# Altium PCB LLR-05U (Secondary-Board-PCB).PcbDoc
Units mil, origin at the board's own origin, x right, y up, seen from the top; angles counter-clockwise.
Board outline 2442.77 x 1283.01 mil, 2 copper layers (Top Layer, Bottom Layer), stack 57 mil thick; 48 components, 33 nets, 142 pads, 63 vias.
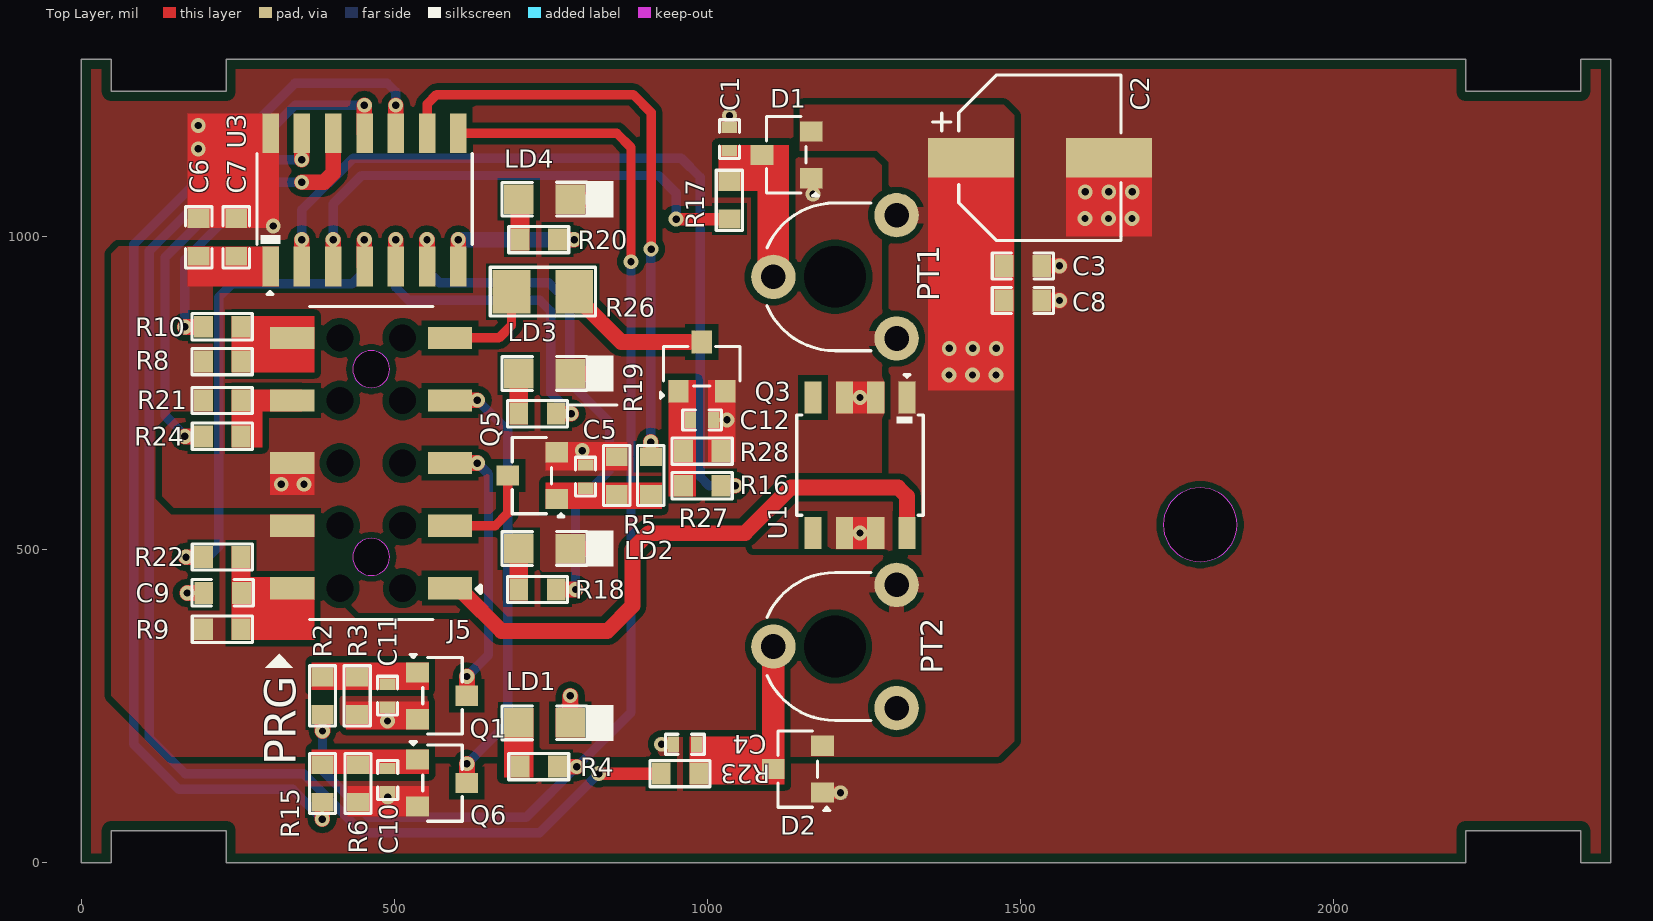
[diagram p0: Top Layer view]
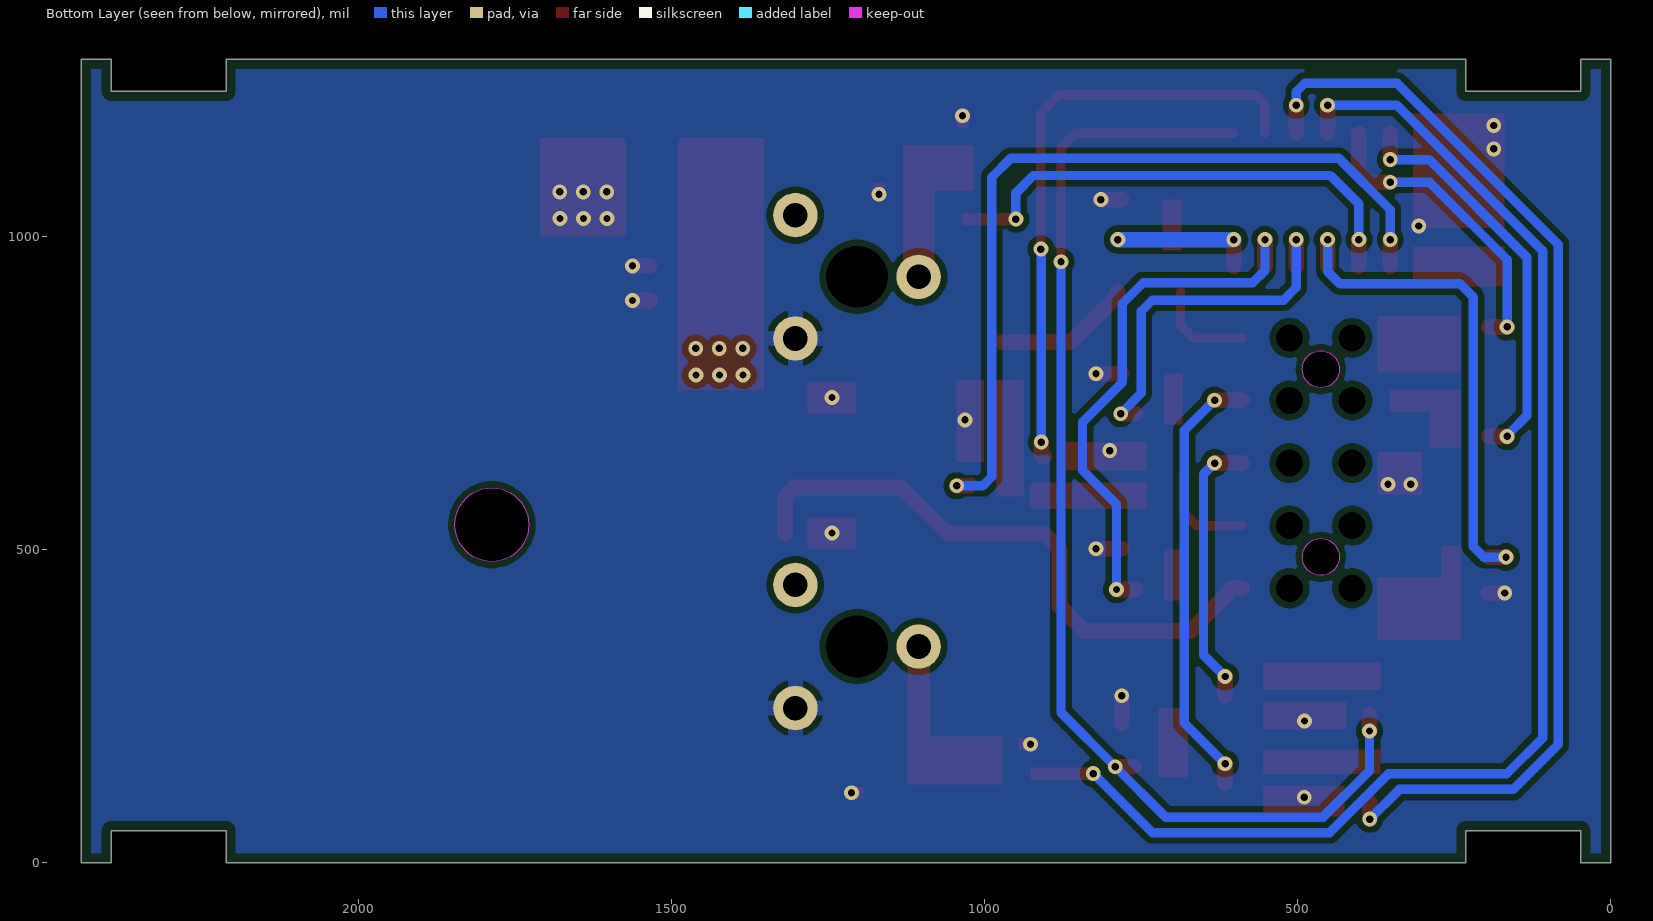
[diagram p1: Bottom Layer view, seen from below]
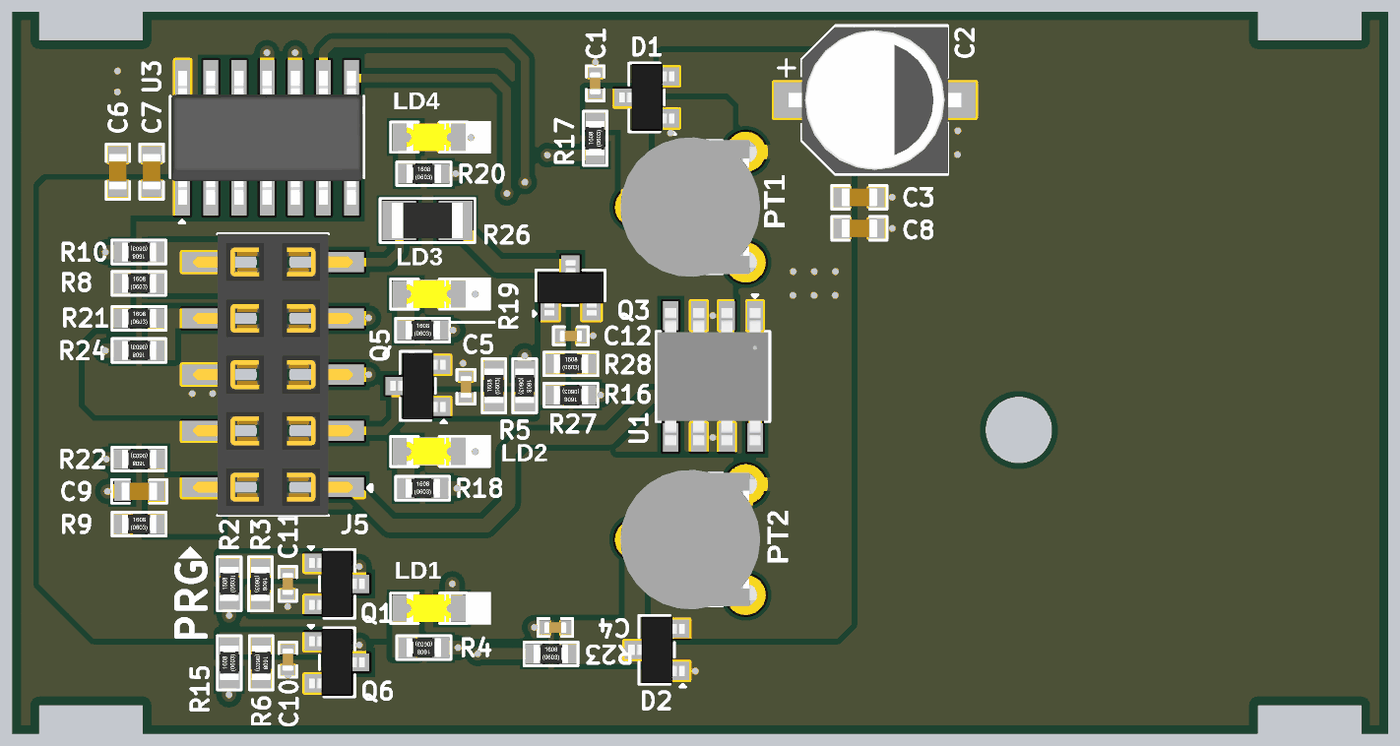
[diagram p2: 3D render of the assembled board from above, using the file's embedded part models]

## Layer stack, top to bottom
Top Solder: solder mask 3, Solder Resist, Dk 3.5
Top Layer: signal copper 10
Dielectric 1: dielectric 37, FR-4, Dk 4.8
Bottom Layer: signal copper 10
Bottom Solder: solder mask 3, Solder Resist, Dk 3.5

## Board outline
47.29,0 47.29,51.18 231.54,51.18 231.54,0 2211.24,0 2211.24,51.18 2395.49,51.18 2395.49,0 2442.77,0 2442.77,1283.02 2395.49,1283.02 2395.49,1231.83 2211.24,1231.83 2211.24,1283.02 231.54,1283.02 231.54,1231.83 47.29,1231.83 47.29,1283.02 0,1283.02 0,0
cut-out: 1728.11,539.81 ccw(c1787.16,539.81) 1787.16,480.75 ccw(c1787.16,539.81) 1846.22,539.81 ccw(c1787.16,539.81) 1787.16,598.86 ccw(c1787.16,539.81)
cut-out: 433.42,488.23 ccw(c462.95,488.23) 462.95,458.7 ccw(c462.95,488.23) 492.47,488.23 ccw(c462.95,488.23) 462.95,517.76 ccw(c462.95,488.23)
cut-out: 433.42,788.23 ccw(c462.95,788.23) 462.95,758.7 ccw(c462.95,788.23) 492.47,788.23 ccw(c462.95,788.23) 462.95,817.76 ccw(c462.95,788.23)

## Design rules (kind name [scope] priority, off if disabled: settings)
BoardOutlineClearance [All] p1: gap=0 ignorepadtopadclearanceinfootprint=FALSE except(15: Poly-OutlineEdge)
Clearance [All] p1: gap=10 ignorepadtopadclearanceinfootprint=FALSE except(0: Arc-Hole Track-Hole SMDPad-Hole THPad-Hole Via-Hole Fill-Hole Poly-Hole Region-Hole Text-Hole; 7: SMDPad-SMDPad SMDPad-Fill SMDPad-Region)
MinimumSolderMaskSliver [All] p1: minsoldermaskwidth=0
PolygonConnect [All] p1: thpad.connectstyle=Relief thpad.reliefconductorwidth=25 thpad.reliefentries=4 thpad.polygonreliefangle="90 Angle" thpad.airgapwidth=10 smdpad.connectstyle=Direct smdpad.reliefconductorwidth=10 smdpad.reliefentries=4 smdpad.polygonreliefangle="90 Angle" smdpad.airgapwidth=10 via.connectstyle=Direct via.reliefconductorwidth=10 via.reliefentries=4 via.polygonreliefangle="90 Angle" via.airgapwidth=10
RoutingVias [All] p1: holewidth=11.81 width=23.62 viastyle="Through Hole" minholewidth=11.81 minwidth=23.62 maxholewidth=11.81 maxwidth=23.62
SilkToSilkClearance [All] p1: silktosilkclearance=5
SilkToSolderMaskClearance [IsPad] p1: minsilkscreentomaskgap=0 clearancetoexposedcopper=TRUE
SolderMaskExpansion [All] p1: expansion=4 istentingtop=FALSE
Width [All] p1: maxlimit=50 minlimit=7 preferedwidth=10 minimp=50.000000 maximp=50.000000 favimp=50.000000
27 further rules are at their usual default settings.

## Components (designator, comment, footprint, x,y, rotation, side; value= is the part's Value field where it differs from the comment)
C1 "10nF" Cap-0402 1035.02,1155.64 r270 top
C2 "100uF" RVT1A101M0605 1531.42,1126 r0 top
C3 "4.7uF" Cap-0603 1504,953 r180 top
C4 "10nF" Cap-0402 964,189 r0 top
C5 "10nF" Cap-0402 805.37,616.55 r270 top
C6 "4.7uF" Cap-0603 187.27,998.8 r270 top
C7 "0.1uF" Cap-0603 247.27,998.8 r270 top value=100nF
C8 "0.1uF" Cap-0603 1504,898 r180 top value=100nF
C9 "0.1uF" Cap-0603 225.5,430.94 r0 top value=100nF
C10 "10nF" Cap-0402 489.24,131.81 r90 top
C11 "10nF" Cap-0402 489.02,266.58 r90 top
C12 "10nF" Cap-0402 991.63,706.94 r180 top
D1 "BAT54S" SOT-23 1126.63,1130.6 r90 top
D2 "BAT54S" SOT-23 1144.57,149.29 r90 top
J5 "610010243021" 610010243021 462.73,638.23 r180 top locked
LD1 "Green-Yellow" LED-0805 739.63,223.06 r0 top locked
LD2 "RED" LED-0805 739.63,501.65 r0 top locked
LD3 "RED" LED-0805 739.63,781.25 r0 top locked
LD4 "RED" LED-0805 739.63,1059.84 r0 top locked
PT1 "PT06-M-V-503(50K)" PT06-M-V-503(50K) 1203.84,935.72 r90 top locked
PT2 "PT06-M-V-503(50K)" PT06-M-V-503(50K) 1203.84,345.17 r90 top locked
Q1 "BC846B(1B)" SOT-23 576.31,266.49 r270 top
Q3 "MMBTA42" SOT-23 991,792.27 r0 top
Q5 "BC846B(1B)" SOT-23 720.13,618.23 r90 top
Q6 "BC846B(1B)" SOT-23 576.31,127.08 r270 top
R2 "1K" Res-0603 385.04,266.48 r270 top
R3 "47K" Res-0603 440.4,266.48 r90 top
R4 "1K" Res-0603 730.53,153.3 r0 top
R5 "47K" Res-0603 855.13,618.23 r270 top
R6 "47K" Res-0603 441.77,126.3 r90 top
R8 "10K" Res-0603 224.8,800.3 r180 top
R9 "10K" Res-0603 225.01,372.68 r180 top
R10 "330R" Res-0603 224.8,855.95 r0 top
R15 "1K" Res-0603 385.04,126.3 r270 top
R16 "1K" Res-0603 991.68,601.96 r0 top
R17 "1K" Res-0603 1035.03,1058.04 r270 top
R18 "3.3k" Res-0603 728.55,436.3 r180 top
R19 "3.3k" Res-0603 728.55,717.15 r180 top
R20 "3.3k" Res-0603 730.53,995.17 r180 top
R21 "10K" Res-0603 224.8,738.14 r180 top
R22 "330R" Res-0603 225.01,488.23 r0 top
R23 "1K" Res-0603 956.35,142.21 r180 top
R24 "330R" Res-0603 225,681 r0 top
R26 "2.2K" Res-1206 737,912 r180 top
R27 "1K" Res-0603 909.56,618.23 r90 top
R28 "47K" Res-0603 991.68,657.33 r180 top
U1 "78L05G-SO8-R" SOP-8 1243.8,634.73 r270 top
U3 "PIC16F1823-I/SL" SOIC-14 452.27,1058.8 r90 top

## Footprints (in the part's own frame and the unit in brackets; to place one, negate y for a bottom-side part, rotate by r counter-clockwise, add the part's x,y. Pads: shape width x height; smd on the part's side, far side on the other; paste and mask are expansions set on the pad)
610010243021 [mm]
  rect 1.8x0.9 smd: 1(-3.2,5.08) 2(3.2,5.08) 3(-3.2,2.54) 4(3.2,2.54) 5(-3.2,0) 6(3.2,0) 7(-3.2,-2.54) 8(3.2,-2.54) 9(-3.2,-5.08) 10(3.2,-5.08)
  round 0 hole 1.1 unplated: ""(-1.27,5.08) ""(-1.27,2.54) ""(-1.27,0) ""(-1.27,-2.54) ""(-1.27,-5.08) ""(1.27,5.08) ""(1.27,2.54) ""(1.27,0) ""(1.27,-2.54) ""(1.27,-5.08)
  silkscreen extent -4.43,-6.35 2.5,6.35, body extent -3.6,-6.35 3.6,6.35, height 3.75
Cap-0402 [mil]
  rect 18x25 smd mask+2.36: 1(-18.5,0) 2(18.5,0)
  silkscreen extent -31,-16 31,16, body extent -20,-10 20,10, height 19
Cap-0603 [mil]
  rect 30x35 smd mask+2.36: 1(-30,0) 2(30,0)
  silkscreen extent -49,-21 49,21, body extent -32,-16 31,16, height 34
LED-0805 [mm]
  rect 1.2x1.2 smd: 1(-1.05,0) 2(1.05,0)
  silkscreen extent -1.73,-0.74 2.79,0.74, body extent -1,-0.62 1,0.63, height 1.1
PT06-M-V-503(50K) [mm]
  round 1.8 hole 1: 1(-2.5,-2.5) 2(0,2.5) 3(2.5,-2.5)
  round 0 hole 2.5 unplated: MH(0,0)
  silkscreen extent -3,-1.45 3,2.76, body extent -3.15,-3.16 3.15,3.2, height 4.15
Res-0603 [mil]
  rect 30x35 smd: 1(-30,0) 2(30,0)
  silkscreen extent -48,-21 48,21, body extent -31,-17 31,17, height 18
Res-1206 [mil]
  rect 60x70 smd: 1(-50,0) 2(50,0)
  silkscreen extent -84,-39 84,39, body extent -63,-31 63,31, height 24
RVT1A101M0605 [mm]
  rect 3.5x1.6 smd: 1(-2.8,0) 2(2.8,0)
  silkscreen extent -4.36,-3.35 3.28,3.35, body extent -3.9,-3.3 3.9,3.3, height 7.75
SOIC-14 [mm]
  rect 1.62x0.67 smd: 1(-2.7,3.81) 2(-2.7,2.54) 3(-2.7,1.27) 4(-2.7,0) 5(-2.7,-1.27) 6(-2.7,-2.54) 7(-2.7,-3.81) 8(2.7,-3.81) 9(2.7,-2.54) 10(2.7,-1.27) 11(2.7,0) 12(2.7,1.27) 13(2.7,2.54) 14(2.7,3.81)
  silkscreen extent -3.84,-4.37 1.88,4.37, body extent -3.01,-4.33 3.01,4.33, height 1.75
SOP-8 [mm]
  rect 1.3x0.7 smd: 1(-2.75,1.905) 2(-2.75,0.635) 3(-2.75,-0.635) 4(-2.75,-1.905) 5(2.75,-1.905) 6(2.75,-0.635) 7(2.75,0.635) 8(2.75,1.905)
  silkscreen extent -3.69,-2.57 2.03,2.57, body extent -3.1,-2.5 3.1,2.5, height 1.76
SOT-23 [mm] "TRANS NPN 40V 0.6A SOT23"
  rect 0.82x0.92 smd: 1(-0.95,-1) 2(0.95,-1) 3(0,1)
  silkscreen extent -1.68,-1.3 1.55,0.81, body extent -1.5,-1.25 1.5,1.25, height 1.05

## Part data
C1 C4 C5 C10 C11 C12: library part CC0402KRX7R8BB103, "CAP CER 10000PF 25V X7R 0402", Case Code (Imperial)=0402, Case Code (Metric)=1005, Dielectric=X7R, LCSC Part Number=C327025, Manufacturer=Yageo, Max Operating Temperature=125°C, Min Operating Temperature=-55°C, Package Quantity=1, Supplier Part Number 1=311-1337-1-ND, Tolerance=10%, Voltage Rating=25V, Capacitance=10nF, Case/Package=0402, ComponentLink1Description=http://www.yageo.com/documents/recent/UPY-GPHC_X7R_6.3V-to-50V_18.pdf?src-supplier=Digi-Key, ComponentLink1URL=http://www.yageo.com/documents/recent/UPY-GPHC_X7R_6.3V-to-50V_18.pdf?src-supplier=Digi-Key, ComponentLink2Description=https://www.verical.com/server-webapp/html/getDatasheet?partID=375418&src-supplier=Verical, ComponentLink2URL=https://www.verical.com/server-webapp/html/getDatasheet?partID=375418&src-supplier=Verical, ComponentLink3Description=http://www.yageo.com/documents/recent/UPY-GPHC_X7R_6.3V-to-50V_8.pdf?src-supplier=Avnet, ComponentLink3URL=http://www.yageo.com/documents/recent/UPY-GPHC_X7R_6.3V-to-50V_8.pdf?src-supplier=Avnet, ComponentLink4Description=https://4donline.ihs.com/images/VipMasterIC/IC/YAGO/YAGO-S-A0003557223/YAGO-S-A0003557223-1.pdf?hkey=52A5661711E402568146F3353EA87419&src-supplier=Element14, ComponentLink4URL=https://4donline.ihs.com/images/VipMasterIC/IC/YAGO/YAGO-S-A0003557223/YAGO-S-A0003557223-1.pdf?hkey=52A5661711E402568146F3353EA87419&src-supplier=Element14, ComponentLink5Description=http://www.farnell.com/datasheets/2167236.pdf?src-supplier=Element14, ComponentLink5URL=http://www.farnell.com/datasheets/2167236.pdf?src-supplier=Element14, ComponentLink6Description=http://www.mouser.com/ds/2/447/Yageo_UPY-GP_NP0_16V-to-50V_9-358835.pdf?src-supplier=Mouser, ComponentLink6URL=http://www.mouser.com/ds/2/447/Yageo_UPY-GP_NP0_16V-to-50V_9-358835.pdf?src-supplier=Mouser, Composition=Ceramic, Depth=0.5mm, Halogen Free="Halogen Free", Height=0.5mm, Item Type=Capacitor, Lead Free="Lead Free", Length=1mm, Manufacturer Part Number=CC0402KRX7R8BB103, Mount="Surface Mount", Packaging="Tape and Reel", Pricing 1="1=0.1, 10=0.021, 100=0.0093, 500=0.00666, 1000=0.00523, 2500=0.00476, 5000=0.00438 (USD)", Radiation Hardening=No, REACH SVHC=Unknown, Stock 1=0, Supplier 1=Digi-Key, Termination=SMD/SMT, Thickness=0.022inch, Voltage Rating (DC)=25V, Width=0.02inch
C2: library part RVT1A101M0605, "100uF 10V 55mA@120Hz ±20% SMD,D6.3xL5.4mm Aluminum Electrolytic Capacitors - SMD ROHS", LCSC Part Number=C72474, Manufacturer=ROQANG, Package=SMD,D6.3xL5.4mm, ComponentLink1Description=LCSC, ComponentLink1URL=https://www.lcsc.com/product-detail/Aluminum-Electrolytic-Capacitors-SMD_ROQANG-RVT1A101M0605_C72474.html, Item Type=Capacitor, Manufacturer Part Number=RVT1A101M0605
C3 C6: library part GRM188R61E475KE11D, "CAP CER 4.7UF 25V X5R 0603", Case Code (Imperial)=0603, Case Code (Metric)=1608, Dielectric=X5R, LCSC Part Number=C90057, Manufacturer=Murata, Max Operating Temperature=85°C, Min Operating Temperature=-55°C, Package Quantity=4000, Supplier Part Number 1=490-7203-1-ND, Tolerance=10%, Voltage=25V, Capacitance=4.7uF, Case/Package=0603, ComponentLink1Description=http://www.farnell.com/datasheets/2048165.pdf?src-supplier=Element14, ComponentLink1URL=http://www.farnell.com/datasheets/2048165.pdf?src-supplier=Element14, ComponentLink2Description=https://www.murata.com/~/media/webrenewal/support/library/catalog/products/capacitor/mlcc/c02e.ashx?la=en-us&src-supplier=Digi-Key, ComponentLink2URL=https://www.murata.com/~/media/webrenewal/support/library/catalog/products/capacitor/mlcc/c02e.ashx?la=en-us&src-supplier=Digi-Key, Depth=0.8mm, Height=0.8mm, Lead Free="Lead Free", Length=1.6mm, Manufacturer Part Number=GRM188R61E475KE11D, Material=Ceramic, Mount="Surface Mount", Packaging="Cut Tape", Pricing 1="1=0.37, 10=0.258, 100=0.1549, 500=0.1162, 1000=0.09812 (USD)", REACH SVHC="No SVHC", Stock 1=71618, Supplier 1=Digi-Key, Thickness=0.031inch, Voltage Rating=25V, Voltage Rating (DC)=25V, Width=0.031inch
C7 C8 C9: library part CL10B104KB8WPNC, "CAP CER 0.1UF 50V X7R 0603", Case Code (Imperial)=0603, Case Code (Metric)=1608, LCSC Part Number=C307348, Max Operating Temperature=125°C, Min Operating Temperature=-55°C, Ratings=AEC-Q200, Supplier Part Number=2575919, Tolerance=10%, Voltage Rating=50V, Case/Package=0603, Category="Ceramic Capacitors", ComponentLink1Description=LCSC, ComponentLink2Description=http://www.farnell.com/datasheets/2710560.pdf?src-supplier=Farnell, ComponentLink2URL=http://www.farnell.com/datasheets/2710560.pdf?src-supplier=Farnell, ComponentLink3Description=http://www.samsungsem.com/kr/support/product-search/mlcc/CL10B104KB8WPNC.jsp?src-supplier=Digi-Key, ComponentLink3URL=http://www.samsungsem.com/kr/support/product-search/mlcc/CL10B104KB8WPNC.jsp?src-supplier=Digi-Key, ComponentLink4Description=http://www.farnell.com/datasheets/2710560.pdf?src-supplier=Element14, ComponentLink4URL=http://www.farnell.com/datasheets/2710560.pdf?src-supplier=Element14, ComponentLink5Description=https://datasheet.octopart.com/CL10B104KB8WPNC-Samsung-Electro-Mechanics-datasheet-120093645.pdf?src-supplier=Future+Electronics, ComponentLink5URL=https://datasheet.octopart.com/CL10B104KB8WPNC-Samsung-Electro-Mechanics-datasheet-120093645.pdf?src-supplier=Future+Electronics, ComponentLink6Description=http://www.farnell.com/datasheets/2710560.pdf?src-supplier=Newark, ComponentLink6URL=http://www.farnell.com/datasheets/2710560.pdf?src-supplier=Newark, ComponentLink7Description=http://www.samsungsem.com/servlet/FileDownload?type=spec&file=CL10B104KB8WPNC.pdf&src-supplier=Avnet, ComponentLink7URL=http://www.samsungsem.com/servlet/FileDownload?type=spec&file=CL10B104KB8WPNC.pdf&src-supplier=Avnet, ComponentLink8Description=https://datasheet.octopart.com/CL10B104KB8WPNC-Samsung-datasheet-8326407.pdf?src-supplier=TME, ComponentLink8URL=https://datasheet.octopart.com/CL10B104KB8WPNC-Samsung-datasheet-8326407.pdf?src-supplier=TME, Height=900um, Item Type=Capacitor, Lead Free=5697LeadFree, Material=4241ConductorMaterial, Mounting Technology="Surface Mount", Packaging="Cut Tape", Pricing="100=0.021, 500=0.019, 1000=0.015, 2000=0.01 (GBP)", RoHS=Yes, RoHS Compliant=Yes, Series=CL, Stock=400, Supplier=Rs, Voltage Rating (DC)=50V
D1 D2: "30V Dual 200mA 800mV@100mA SOT-23 Schottky Barrier Diodes (SBD) ROHS", LCSC Part Number=C916425, Manufacturer=JSMSEMI, Package=SOT-23, ComponentLink1Description=LCSC, ComponentLink1URL=https://www.lcsc.com/product-detail/Schottky-Barrier-Diodes-SBD_JSMSEMI-BAT54S_C916425.html, Item Type=Diode, Manufacturer Part Number=BAT54S
J5: "SMT Vertical Socket Header WR-PHD, Pitch 2.54 mm, Dual Row, 10 pins", LCSC Part Number=C6848484, Manufacturer="Wurth Electronics", Supplier Part Number=2827934, Item Type="Female Header", Manufacturer Part Number=610010243021, Pricing="1=1.86, 10=1.41, 100=1.22, 250=1.12, 500=1.05, 1000=0.972 (GBP)", RoHS=Yes, RoHS Compliant=Yes, Stock=117, Supplier=Farnell
LD1: library part XL-2012SYGC, "0805 普绿色 (Iv=26-75mcd(Typ) @IF=5mA)", LCSC Part Number=C965816, Manufacturer=XINGLIGHT, Item Type=LED, Manufacturer Part Number=XL-2012SYGC, RoHS=No, Supplier=LCSC
LD2 LD3 LD4: library part NCD0805R1, "20mA 无色透明透镜 67mcd~195mcd -30℃~+85℃ 615nm~630nm 独立二极管 Red 130° 65mW 1.6V~2.6V 0805 Light Emitting Diodes (LED) ROHS", LCSC Part Number=C84256, Manufacturer="FOSHAN Nationstar Optoelectronics", Item Type=LED, Manufacturer Part Number=NCD0805R1, RoHS=No, Supplier=LCSC
PT1 PT2: "20% 150mW 50kΩ - Variable Resistors/Potentiometers ROHS", LCSC Part Number=C5205067, Manufacturer=BOCHEN, Package=Custom, ComponentLink1Description=LCSC, ComponentLink1URL=https://www.lcsc.com/product-detail/Variable-span-style-background-color-ff0-Resistors-span-Potentiometers_BOCHEN-Chengdu-Guosheng-Tech-PT10-M-V-503-50K_C5205087.html, Item Type=Potentiometer, Manufacturer Part Number=PT06-M-V-503(50K)
Q1 Q5 Q6: "65V 300mW 200@2mA,5V 100mA NPN SOT-23 Bipolar Transistors - BJT ROHS", LCSC Part Number=C118727, Manufacturer=ST(Semtech), Package=SOT-23, ComponentLink1Description=LCSC, ComponentLink1URL=https://www.lcsc.com/product-detail/Transistors-NPN-PNP_ST-Semtech-BC846B-1B_C118727.html, Item Type=Transistor, Manufacturer Part Number=BC846B(1B)
Q3: "300V 350mW 100@10mA,10V 300mA NPN SOT-23 Bipolar Transistors - BJT ROHS", LCSC Part Number=C181172, Manufacturer="Guangdong Hottech", Package=SOT-23, ComponentLink1Description=LCSC, ComponentLink1URL=https://www.lcsc.com/product-detail/Bipolar-Transistors-BJT_Guangdong-Hottech-MMBTA42_C181172.html, Item Type=Transistor, Manufacturer Part Number=MMBTA42
R2 R4 R15 R16 R17 R23 R27: library part RT0603BRD071KL, "RES SMD 1K OHM 0.1% 1/10W 0603", Case Code (Imperial)=0603, Case Code (Metric)=1608, LCSC Part Number=C110776, Manufacturer=Yageo, Max Operating Temperature=125°C, Max Power Dissipation=100mW, Min Operating Temperature=-55°C, Package Quantity=5000, Resistance=1kR, Resistor Type="Thin Film", Temperature Coefficient=25ppm/°C, Voltage Rating=75V, Voltage Rating (DC)=50V, Case/Package=0603, Category="Chip SMD Resistors", ComponentLink1Description=https://datasheet.ciiva.com/11819/0900766b8079c86e-11819652.pdf?src-supplier=RSComponents, ComponentLink1URL=https://datasheet.ciiva.com/11819/0900766b8079c86e-11819652.pdf?src-supplier=RSComponents, ComponentLink2Description=https://datasheet.ciiva.com/5624/pyu-rt-1-to-0-05-rohs-l-4-5624759.pdf?src-supplier=Mouser, ComponentLink2URL=https://datasheet.ciiva.com/5624/pyu-rt-1-to-0-05-rohs-l-4-5624759.pdf?src-supplier=Mouser, ComponentLink3Description=https://datasheet.ciiva.com/29718/pyu-rt-1-to-0-05-rohs-l-4-29718010.pdf?src-supplier=Digi-Key, ComponentLink3URL=https://datasheet.ciiva.com/29718/pyu-rt-1-to-0-05-rohs-l-4-29718010.pdf?src-supplier=Digi-Key, ComponentLink4Description=https://datasheet.ciiva.com/29718/pyu-rt-1-to-0-05-rohs-l-4-29718011.pdf?src-supplier=Digi-Key, ComponentLink4URL=https://datasheet.ciiva.com/29718/pyu-rt-1-to-0-05-rohs-l-4-29718011.pdf?src-supplier=Digi-Key, Construction=Rectangular, Contact Plating=Tin,Lead, Depth=0.8mm, Features="Moisture Resistant", Height=0.022inch, Item Type=Resistor, Lead Free="Lead Free", Length=1.6mm, Manufacturer Part Number=RT0603BRD071KL, Military Standard=Not, Mount="Surface Mount", Number of Terminations=2, Packaging="Tape and Reel", Power Rating=100mW, Pricing 1="5000=0.03900, 10000=0.03450, 25000=0.03070, 50000=0.02040 (USD)", RoHS=Yes, RoHS Compliant=Yes, Series=RT, Size Code=0603, Stock 1=130000, Supplier 1="Arrow Electronics", Supplier Part Number 1=RT0603BRD071KL, Technology="THIN FILM", Termination=SMD/SMT, Width=0.031inch
R3 R5 R6 R28: library part RT0603BRD0747KL, "RES SMD 47K OHM 0.1% 1/10W 0603", Case Code (Imperial)=0603, Case Code (Metric)=1608, LCSC Part Number=C326725, Manufacturer=Yageo, Max Operating Temperature=125°C, Max Power Dissipation=100mW, Min Operating Temperature=-55°C, Package Quantity=5000, Resistance=47kR, Resistor Type="Thin Film", Temperature Coefficient=25ppm/°C, Voltage Rating=75V, Voltage Rating (DC)=50V, Case/Package=0603, Category="Chip SMD Resistors", ComponentLink1Description=https://datasheet.ciiva.com/2585/pyu-rt-1-to-0-05-rohs-l-4-2585964.pdf?src-supplier=Digi-Key, ComponentLink1URL=https://datasheet.ciiva.com/2585/pyu-rt-1-to-0-05-rohs-l-4-2585964.pdf?src-supplier=Digi-Key, ComponentLink2Description=https://datasheet.ciiva.com/46635/pyu-rt-1-to-0-05-rohs-l-5-46635309.pdf?src-supplier=Digi-Key, ComponentLink2URL=https://datasheet.ciiva.com/46635/pyu-rt-1-to-0-05-rohs-l-5-46635309.pdf?src-supplier=Digi-Key, Construction=Rectangular, Contact Plating=Tin,Lead, Depth=0.8mm, Features="Moisture Resistant", Height=0.022inch, Item Type=Resistor, Lead Free="Lead Free", Length=0.063inch, Manufacturer Part Number=RT0603BRD0747KL, Military Standard=Not, Number of Terminations=2, Packaging="Tape and Reel", Power Rating=100mW, Pricing 1="1=0.29190, 10=0.22910, 25=0.22680, 100=0.09530, 250=0.09440, 500=0.09340, 1000=0.04780, 3000=0.03070 (USD)", RoHS=Yes, RoHS Compliant=Yes, Series=RT, Stock 1=5153, Supplier 1="Arrow Electronics", Supplier Part Number 1=RT0603BRD0747KL, Termination=SMD/SMT, Width=0.031inch
R8 R9 R21: library part RC0603FR-0710KL, "RES SMD 10K Ohm 1% 1/10W 0603", Case Code (Imperial)=0603, Case Code (Metric)=1608, LCSC Part Number=C98220, Manufacturer=Yageo, Max Operating Temperature=155°C, Max Power Dissipation=100mW, Min Operating Temperature=-55°C, Resistance=10kR, Resistance Tolerance=1%, Resistor Type="Thick Film", Supplier Part Number 1=311-10.0KHRCT-ND, Temperature Coefficient=100ppm/°C, Voltage Rating=75V, Voltage Rating (DC)=50V, Case/Package=0603, Category="Chip SMD Resistors", ComponentLink1Description=https://datasheet.ciiva.com/7660/38590-7660789.pdf?src-supplier=Element14, ComponentLink1URL=https://datasheet.ciiva.com/7660/38590-7660789.pdf?src-supplier=Element14, ComponentLink2Description=https://datasheet.ciiva.com/7983/443971-7983596.pdf?src-supplier=Element14, ComponentLink2URL=https://datasheet.ciiva.com/7983/443971-7983596.pdf?src-supplier=Element14, ComponentLink3Description=https://datasheet.ciiva.com/22747/443971-22747519.pdf?src-supplier=Element14, ComponentLink3URL=https://datasheet.ciiva.com/22747/443971-22747519.pdf?src-supplier=Element14, ComponentLink4Description=https://datasheet.ciiva.com/46440/1868787-46440891.pdf?src-supplier=Element14, ComponentLink4URL=https://datasheet.ciiva.com/46440/1868787-46440891.pdf?src-supplier=Element14, ComponentLink5Description=https://datasheet.ciiva.com/7746/1738695-7746239.pdf?src-supplier=Element14, ComponentLink5URL=https://datasheet.ciiva.com/7746/1738695-7746239.pdf?src-supplier=Element14, ComponentLink6Description=https://datasheet.ciiva.com/15189/getdatasheetpartid-409289-15189591.pdf?src-supplier=Verical, ComponentLink6URL=https://datasheet.ciiva.com/15189/getdatasheetpartid-409289-15189591.pdf?src-supplier=Verical, Construction=Rectangular, Depth=0.8mm, Features="Moisture Resistant", Height=0.45mm, Item Type=Resistor, Lead Free="Lead Free", Lead Pitch=0.3mm, Length=1.6mm, Manufacturer Part Number=RC0603FR-0710KL, Military Standard=Not, Number of Pins=2, Number of Terminations=2, Packaging="Tape and Reel", Power Rating=100mW, Pricing 1="1=0.10000, 10=0.02400, 100=0.00970, 1000=0.00436, 2500=0.00378 (USD)", REACH SVHC=Unknown, RoHS=Yes, RoHS Compliant=Yes, Series=RC, Size Code=0603, Stock 1=25249139, Supplier 1=Digi-Key, Termination=SMD/SMT, Tolerance=1%, Weight=7.1E-05oz, Width=0.8mm
R10 R22 R24: library part 0603WAF3300T5E, "100mW Thick Film Resistors 75V ±100ppm/℃ ±1% 330Ω 0603 Chip Resistor - Surface Mount ROHS", LCSC Part Number=C23138, Manufacturer="Royal Electronic Factory", Supplier Part Number=303-0603WAF3300T5E, Item Type=Resistor, Manufacturer Part Number=0603WAF3300T5E, Pricing="10000=0.001 (USD)", RoHS=No, Stock=210000, Supplier=Mouser
R18 R19 R20: library part RT0603BRD073K3L, "RES SMD 3.3K OHM 0.1% 1/10W 0603", Case Code (Imperial)=0603, Case Code (Metric)=1608, LCSC Part Number=C309653, Manufacturer=Yageo, Max Operating Temperature=125°C, Max Power Dissipation=100mW, Min Operating Temperature=-55°C, Package Quantity=5000, Resistance=3.3kR, Resistor Type="Thin Film", Temperature Coefficient=25ppm/°C, Tolerance=0.1%, Voltage Rating=75V, Voltage Rating (DC)=50V, Case/Package=0603, Category="Chip SMD Resistors", ComponentLink1Description=https://datasheet.ciiva.com/11814/0900766b8027bd26-11814026.pdf?src-supplier=Rs, ComponentLink1URL=https://datasheet.ciiva.com/11814/0900766b8027bd26-11814026.pdf?src-supplier=Rs, ComponentLink2Description=https://datasheet.ciiva.com/12694/pyu-rt-1-to-0-05-rohs-l-4-12694839.pdf?src-supplier=Mouser, ComponentLink2URL=https://datasheet.ciiva.com/12694/pyu-rt-1-to-0-05-rohs-l-4-12694839.pdf?src-supplier=Mouser, ComponentLink3Description=https://datasheet.ciiva.com/2585/pyu-rt-1-to-0-05-rohs-l-4-2585926.pdf?src-supplier=Digi-Key, ComponentLink3URL=https://datasheet.ciiva.com/2585/pyu-rt-1-to-0-05-rohs-l-4-2585926.pdf?src-supplier=Digi-Key, Construction=Rectangular, Contact Plating=Tin,Lead, Depth=0.8mm, Features="Moisture Resistant", Height=0.022inch, Item Type=Resistor, Lead Free="Lead Free", Length=0.063inch, Manufacturer Part Number=RT0603BRD073K3L, Military Standard=Not, Number of Terminations=2, Packaging="Tape and Reel", Power Rating=100mW, Pricing 1="1=0.30610, 10=0.21080, 25=0.17430, 100=0.09180, 250=0.09000, 500=0.07600, 1000=0.04220 (USD)", RoHS=Yes, RoHS Compliant=Yes, Series=RT, Stock 1=2417, Supplier 1="Arrow Electronics", Supplier Part Number 1=RT0603BRD073K3L, Termination=SMD/SMT, Width=0.031inch
R26: library part 1206W4F2201T5E, "250mW Thick Film Resistors 200V ±100ppm/℃ ±1% 2.2kΩ 1206 Chip Resistor - Surface Mount ROHS", LCSC Part Number=C17948, Manufacturer=Uniroyal, Category=LDO, Item Type=Resistor, Manufacturer Part Number=1206W4F2201T5E, RoHS=Yes, RoHS Compliant=Yes, Supplier=LCSC
U1: "Pos 5V 0.1A 8-Pin SOP T/R", LCSC Part Number=-, Manufacturer=Unisonic, Package=SOP-8, ComponentLink1Description=Chipsmall, ComponentLink1URL=https://www.chipsmall.com/Products/78L05G-SO8-R_35000047.html, Item Type=IC, Manufacturer Part Number=78L05G-SO8-R
U3: "IC MCU 8BIT 3.5KB FLASH 14SOIC", Manufacturer=Microchip, Supplier Part Number=PIC16F1823-I/SL-ND, ComponentLink1Description=https://datasheet.ciiva.com/22671/1645109-22671365.pdf?src-supplier=Element14, ComponentLink1URL=https://datasheet.ciiva.com/22671/1645109-22671365.pdf?src-supplier=Element14, ComponentLink2Description=https://datasheet.ciiva.com/14132/pic12f1822-16f1823-eng-tds-14132380.pdf?src-supplier=Distrelec, ComponentLink2URL=https://datasheet.ciiva.com/14132/pic12f1822-16f1823-eng-tds-14132380.pdf?src-supplier=Distrelec, ComponentLink3Description=https://datasheet.ciiva.com/6641/41413c-6641949.pdf?src-supplier=Digikey, ComponentLink3URL=https://datasheet.ciiva.com/6641/41413c-6641949.pdf?src-supplier=Digikey, ComponentLink4Description=https://datasheet.ciiva.com/9229/41414d-9229034.pdf?src-supplier=Avnet, ComponentLink4URL=https://datasheet.ciiva.com/9229/41414d-9229034.pdf?src-supplier=Avnet, ComponentLink5Description=https://datasheet.ciiva.com/29331/651599-da-01-en-ic-mcu-pic16f1823-i-sl-soic-14-mcp-29331420.pdf?src-supplier=Conrad, ComponentLink5URL=https://datasheet.ciiva.com/29331/651599-da-01-en-ic-mcu-pic16f1823-i-sl-soic-14-mcp-29331420.pdf?src-supplier=Conrad, Item Type=Microprocessors, Manufacturer Part Number=PIC16F1823-I/SL, Pricing="1=1.4, 25=1.28, 100=1.18 (USD)", RoHS=Yes, Stock=47700, Supplier=Digikey

## Via types
v1: diameter 23.62, hole 11.81, Top Layer to Bottom Layer, tented both sides, 63 vias

## Nets (pads, with @x,y where several pads share a name; then routed paths per layer and width w, separated by ;. In a path a pad name is that pad's centre, name@x,y a point inside that pad or via, vN(x,y) a via of type N, cw(c..) or ccw(c..) an arc to the next point about the centre after c; other vN are vias at no path point)
+5V: C2.1 C3.2 C6.2 C7.2 C8.2 D1.2 D2.2 J5.4 PT1.3 PT2.3 R8.2 R9.2 R21.2 U1.1 U3.1
  other v1: 1386,779 1423.5,779 1461,779 1386.45,821.41 1423.95,821.41 1461.45,821.41
+12V-1: J5.1 U1.8 | length 972.7
  Top Layer w25: J5.1 606.43,438.23 611.64,433.02 611.64,429.36 671,370 840.15,370 880.38,410.23 880.38,500.4 906.28,526.31 1060.14,526.31 1133.03,599.2 1304.6,599.2 1318.8,585 U1.8
GND: C1.1 C2.2 C3.1 C4.1 C5.1 C6.1 C7.1 C8.1 C9.1 C10.1 C11.1 C12.1 D1.1 D2.1 J5.6 LD1.2 LD2.2 LD3.2 LD4.2 PT1.1 PT2.1 Q1.2 Q3.2 Q5.2 Q6.2 R3.1 R5.1 R6.1 R28.1 U1.2 U1.3 U1.6 U1.7 U3.14 | length 243.5
  Top Layer w25: v1(169.04,430.71) C9.1@195.27,430.71 ; C6.1@186.61,1029 C6.1@187.04,1028.57 ; U3.14@302,1165.37 U3.14 ; LD1.2@780.97,222.83 LD1.2 v1(780.97,266.49) ; LD2.2@780.97,501.42 v1(821.98,501.42) ; LD3.2@780.97,781.01 v1(821.99,781.01) ; LD4.2@780.97,1059.6 781.41,1059.16 v1(814.14,1059.16) ; C8.1@1534,897.77 1534.23,898 v1(1562.48,898) ; C3.1@1534,952.77 1534.43,953.2 v1(1562.48,953.2)
  other v1: 489.24,104.31 1212.62,111.69 926.65,189.19 489,226.13 1243.8,526.46 319.23,604.53 355.59,604.53 800.17,658.16 1031.32,707.16 1243.8,742.99 306.27,1016.98 1603.24,1028.96 1640.74,1028.96 1678.24,1028.96 1168.69,1067.58 1603.69,1071.37 1641.19,1071.37 1678.69,1071.37 186.61,1140.11 186.61,1177.43 1035.21,1192.99
J5-2: C9.2 J5.2 R9.1 R22.2
J5-3: J5.3 Q5.3 | length 160.5
  Top Layer w15: J5.3 661.03,538.23 680.76,557.96 Q5.3
J5-5: J5.5 Q1.3 | length 437.1
  Top Layer w25: J5.5 v1(632.57,638.23) ; Q1.3@615.81,266.58 v1(615.81,297.25)
  Bottom Layer w15: v1(615.81,297.25) 650.21,331.65 650.21,620.59 v1(632.57,638.23)
J5-7: J5.7 Q6.3 | length 702.5
  Top Layer w25: J5.7@588.71,738.73 v1(632.57,738.73) ; Q6.3@615.81,127.18 v1(615.81,157.84)
  Bottom Layer w15: v1(615.81,157.84) 681,223.03 681,690.29 v1(632.57,738.73)
J5-8: J5.8 R21.1 R24.2
J5-9: J5.9 R26.2 | length 160.3
  Top Layer w15: J5.9 666.95,838.23 687,858.28 R26.2
J5-10: J5.10 R8.1 R10.2
NetC1_2: C1.2 D1.3 PT1.2 R17.1 | length 13.3
  Top Layer w10: PT1.2 PT1.2@1105.41,948.98
NetC4_2: C4.2 D2.3 PT2.2 R23.1
NetC5_2: C5.2 Q5.1 R5.2 R27.1
NetC10_2: C10.2 Q6.1 R6.2 R15.1
NetC11_2: C11.2 Q1.1 R2.1 R3.2
NetC12_2: C12.2 Q3.1 R16.1 R28.2
NetLD1_1: LD1.1 R4.1
NetLD2_1: LD2.1 R18.2
NetLD3_1: LD3.1 R19.2
NetLD4_1: LD4.1 R20.2
NetQ3_3: Q3.3 R26.1 | length 220.2
  Top Layer w25: R26.1 787,907 804.5,889.5 862.36,831.64 971,831.64
U3-RA0: R24.1 U3.13 | length 654.3
  Top Layer w25: v1(165.19,680.77) R24.1@194.7,680.77 ; v1(352,1123) U3.13@352,1165.37
  Bottom Layer w15: v1(165.19,680.77) 165.19,682.57 133.45,714.31 133.45,966.77 289.68,1123 v1(352,1123)
U3-RA1: R10.1 U3.12 | length 494.6
  Top Layer w25: v1(165.19,855.72) R10.1@194.5,855.72 ; v1(352,1087) 387.62,1087 402.27,1101.64 U3.12
  Bottom Layer w15: v1(165.19,855.72) 165.19,963.15 289.04,1087 v1(352,1087)
U3-RA2: R23.2 U3.11 | length 2082.4
  Top Layer w25: U3.11@452,1165.37 v1(452,1210)
  Bottom Layer w15: v1(452,1210) 341.33,1210 108.45,977.12 108.45,199.14 165.71,141.87 354.67,141.87 448.84,47.7 731.82,47.7 v1(826.32,142.21)
U3-RA3: R22.1 U3.4 | length 828.6
  Top Layer w25: v1(167,488) 194.71,488 R22.1@194.74,487.96 ; U3.4@452,952.77 v1(452,995.17)
  Bottom Layer w15: v1(167,488) 202.59,488 219.5,504.91 219.5,903.44 241.06,925 432.85,925 452,944.14 v1(452,995.17)
U3-RA4: R17.2 U3.3 | length 719.5
  Top Layer w25: U3.3@402,952.77 v1(402,995.17)
  Bottom Layer w15: v1(402,995.17) 402,1052.09 447.57,1097.66 922.1,1097.66 950,1069.77 v1(950,1028.04)
U3-RA5: R16.2 U3.2 | length 1335.7
  Top Layer w25: U3.2@352,952.77 v1(352,995.17) ; R16.2@1022.99,603 1024.03,601.96 v1(1044.54,601.96)
  Bottom Layer w15: v1(352,995.17) 352,1043 434,1125 958.38,1125 988.51,1094.87 988.51,616.21 1002.69,602.04 v1@1044.54,602.04
U3-RC0: R15.2 U3.10 | length 1773.2
  Top Layer w25: v1(384.61,69.53) 384.61,95.87 R15.2 ; U3.10@502,1165.37 v1(502,1210)
  Bottom Layer w15: v1(384.61,69.53) 337.27,116.87 155.36,116.87 83.45,188.78 83.45,987.48 340.97,1245 488.53,1245 502,1231.53 v1(502,1210)
U3-RC1: R27.2 U3.9 | length 976.2
  Top Layer w15: U3.9 552.27,1211.9 567.3,1226.93 881.36,1226.93 910,1198.29 v1(910,980)
  Top Layer w25: R27.2@904.79,648.23 907.06,648.23 909.56,650.73 v1(909.56,671.78)
  Bottom Layer w15: v1(909.56,671.78) 909.78,672 909.78,979.78 v1(910,980)
U3-RC2: R2.2 R4.2 U3.8 | length 1900.8
  Top Layer w15: U3.8 855.25,1165.1 878,1142.35 v1(878,960)
  Top Layer w25: v1(384.99,210.24) R2.2 ; R4.2@760.63,153.17 v1(791.3,153.17)
  Bottom Layer w15: v1(384.99,210.24) 385.04,146.86 459.2,72.7 710.83,72.7 v1(791.3,153.17) 878,239.87 v1(878,960)
U3-RC3: R20.1 U3.7 | length 254
  Top Layer w25: U3.7@602,952.77 v1(602,995.17) ; R20.1@760.53,994.94 760.77,995.17 v1(787,995.17)
  Bottom Layer w25: v1(602,995.17) v1(787,995.17)
U3-RC4: R18.1 U3.6 | length 877.7
  Top Layer w25: U3.6@552,952.77 v1(552,995.17) ; R18.1@758.65,436.17 v1(789.32,436.17)
  Bottom Layer w15: v1(552,995.17) 552,946.01 571.82,926.19 746.54,926.19 780,892.73 780,767.1 843.62,703.49 843.62,626.89 789.32,572.59 v1(789.32,436.17)
U3-RC5: R19.1 U3.5 | length 583.5
  Top Layer w25: U3.5@502,952.77 v1(502,995.17) ; R19.1 v1(782.61,717.15)
  Bottom Layer w15: v1(502,995.17) 502,919 522.5,898.5 732.04,898.5 749.65,880.89 749.65,750.1 v1(782.61,717.15)
pads on no net: J5. PT1.MH PT2.MH U1.4 U1.5

## Polygon pours and split planes (outlines as drawn)
GND on Bottom Layer "GND_L02_P006" (solid, pour order 6): 0,-2.51 47.29,-2.51 49.8,0 49.8,48.67 229.02,48.67 229.02,0 231.54,-2.51 2211.24,-2.51 2213.75,0 2213.75,48.67 2392.97,48.67 2392.97,0 2395.49,-2.51 2442.77,-2.51 2445.29,0 2445.29,1283.02 2442.77,1285.53 2395.49,1285.53 2392.97,1283.02 2392.97,1234.35 2213.75,1234.35 2213.75,1283.02 2211.24,1285.53 231.54,1285.53 229.02,1283.02 229.02,1234.35 49.8,1234.35 49.8,1283.02 47.29,1285.53 0,1285.53 -2.51,1283.02
GND on Top Layer "GND_L01_P003" (solid, pour order 3): 0,-2.51 47.29,-2.51 49.8,0 49.8,48.67 229.02,48.67 229.02,0 231.54,-2.51 2211.24,-2.51 2213.75,0 2213.75,48.67 2392.97,48.67 2392.97,0 2395.49,-2.51 2442.77,-2.51 2445.29,0 2445.29,1283.02 2442.77,1285.53 2395.49,1285.53 2392.97,1283.02 2392.97,1234.35 2213.75,1234.35 2213.75,1283.02 2211.24,1285.53 231.54,1285.53 229.02,1283.02 229.02,1234.35 49.8,1234.35 49.8,1283.02 47.29,1285.53 0,1285.53 -2.51,1283.02
+5V on Top Layer "+5V_L01_P004" (solid, pour order 4): 1249.63,517.91 909.91,517.91 781,389 438.74,389 372.18,455.56 372.18,555.95 143.05,555.95 118,581 118,694 144.64,720.64 209.8,720.64 209.8,984.39 59.17,984.39 47.29,972.52 47.29,266.04 144.33,169 1465,169 1490.08,194.08 1490.08,1193.92 1473,1211 1153,1211 1147.89,1205.89 1147.89,1137.14 1270.67,1137.14 1289.29,1118.51 1289.29,557.58

## Other copper
Top Layer:
  region net U3-RA2: 926.35,132.31 926.35,152.24 826.32,152.24 826.32,132.31
  region net GND: 1193.77,121.78 1193.77,101.84 1212.62,101.84 1212.62,121.78
  rectangle net NetC4_2: 971.35,124.71 1123.31,201.5
  region net GND: 945.5,179.11 945.5,199.04 926.65,199.04 926.65,179.11
  rectangle net NetC4_2: 1087.09,133.14 1123.31,345.17
  region net GND: 1178.78,1086.43 1158.84,1086.43 1158.84,1067.58 1178.78,1067.58
  region net U3-RA4: 1035.03,1018.14 1035.03,1038.07 950,1038.07 950,1018.14
  rectangle net NetC1_2: 1080.36,935.72 1130.47,1146.74
  rectangle net GND: 1025.13,1174.14 1045.06,1192.99
  rectangle net NetC1_2: 1017.53,1073.04 1105.37,1146.74
  rectangle net GND: 169.77,1013.8 315.46,1196.99
  rectangle net J5-2: 240.01,355.18 270.01,505.73
  rectangle net GND: 1205.02,500.87 1282.58,552.05
  rectangle net GND: 301.31,587 372.18,655.95
  rectangle net GND: 169.77,1013.8 264.77,1043.8
  rectangle net NetC12_2: 937.46,584.46 982.13,771.01
  rectangle net NetC5_2: 741.39,564.69 927.06,607.05
  rectangle net GND: 741.39,626.05 872.63,671.78
  rectangle net GND: 1001.13,639.83 1044.54,771.01
  rectangle net +5V: 1352.29,754 1490.08,1157.5
  rectangle net GND: 1572.76,1000 1710.55,1157.5
  rectangle net NetLD1_1: 674.67,135.8 721.92,246.69
  rectangle net NetLD4_1: 685.53,977.67 715.53,1059.27
  rectangle net NetLD2_1: 683.55,418.8 713.55,500.4
  rectangle net NetLD3_1: 683.55,699.65 713.55,781.25
  rectangle net GND: 424.69,73.54 555.05,122.31
  rectangle net NetC10_2: 367.54,141.3 555.05,180.62
  rectangle net GND: 422.9,212.94 555.05,257.08
  rectangle net NetC11_2: 367.54,276.08 555.05,320.03
  rectangle net J5-2: 240.01,355.18 372.18,455.95
  rectangle net J5-8: 240,663.5 289.08,755.64
  rectangle net J5-10: 239.8,782.8 372.18,873.45
  rectangle net J5-8: 239.8,720.64 352.27,755.95
  rectangle net GND: 1205.02,717.4 1282.58,768.59
  region net +5V: 315.46,920.61 315.46,984.39 169.77,984.39 169.77,920.61

## Silkscreen, mask and mechanical layers (free items; w line width, h text height)
Top Overlay:
  region: 293.85,311.54 337.71,311.54 315.78,333.47
  lines w5: 777.96,731.13 855.33,731.13
  text "PRG" at 342.65,155.2 h50 r90
Dimensions:
  drawing of 191 lines, arcs and shapes, not listed
  text "Layer" at -950.12,3839.68 h60
  text "Name" at -540.21,3839.68 h60
  text "Material" at 389.54,3839.68 h60
  text "Thickness" at 1249.3,3839.68 h60
  text "Constant" at 1899.14,3839.68 h60
  text "Board Layer Stack" at 2469,3839.68 h60
  text "Top Overlay" at -540.21,3719.68 h60
  text "Top Solder" at -540.21,3599.68 h60
  text "Solder Resist" at 389.54,3599.68 h60
  text "0.076mm" at 1249.3,3599.68 h60
  text "3.5" at 1899.14,3599.68 h60
  text "1" at -950.12,3479.68 h60
  text "Top Layer" at -540.21,3479.68 h60
  text "0.254mm" at 1249.3,3479.68 h60
  text "Dielectric 1" at -540.21,3359.68 h60
  text "FR-4" at 389.54,3359.68 h60
  text "0.940mm" at 1249.3,3359.68 h60
  text "4.8" at 1899.14,3359.68 h60
  text "2" at -950.12,3239.68 h60
  text "Bottom Layer" at -540.21,3239.68 h60
  text "0.254mm" at 1249.3,3239.68 h60
  text "Bottom Solder" at -540.21,3119.68 h60
  text "Solder Resist" at 389.54,3119.68 h60
  text "0.076mm" at 1249.3,3119.68 h60
  text "3.5" at 1899.14,3119.68 h60
  text "Bottom Overlay" at -540.21,2999.68 h60
  text "Total board thickness:" at -950.12,2879.68 h60
  text "1.600mm" at 1249.3,2879.68 h60
Board Outline:
  circle w5: c1787.16,539.81 r59.06
  circle w2: c462.95,488.23 r29.53
  circle w2: c462.95,788.23 r29.53
  lines w5: 46.74,0.55 47.29,0 ; 47.29,0 47.29,51.18 231.54,51.18 231.54,0 2211.24,0 2211.24,51.18 2395.49,51.18 2395.49,0 2442.77,0 2442.77,1283.02 2395.49,1283.02 2395.49,1231.83 2211.24,1231.83 2211.24,1283.02 231.54,1283.02 231.54,1231.83 47.29,1231.83 47.29,1283.02 0,1283.02 0,0 47.29,0
Drill Drawing:
  circle w10: c-932.52,2365.33 r33.33
  lines w10: -965.85,2032 -899.19,2032 -899.19,2098.67 -965.85,2098.67 -965.85,2032 ; -965.85,2198.67 -949.19,2198.67 -932.52,2182 -915.85,2198.67 -899.19,2198.67 -915.85,2215.33 -899.19,2232 -915.85,2232 -932.52,2248.67 -949.19,2232 -965.85,2232 -949.19,2215.33 -965.85,2198.67 ; -965.85,2548.67 -899.19,2548.67 -932.52,2482 -965.85,2548.67
  lines w15: -1025.64,1987 9545.42,1987 ; -1025.64,2587 9545.42,2587 ; -474.77,1837 -474.77,2737 ; 55.1,1837 55.1,2737 ; 1154.77,1837 1154.77,2737 ; 1660.65,1837 1660.65,2737 ; 2394.45,1837 2394.45,2737 ; 3894,1837 3894,2737 ; 4483.85,1837 4483.85,2737 ; 5229.65,1837 5229.65,2737 ; 5979.44,1837 5979.44,2737 ; 6833.21,1837 6833.21,2737 ; 8166.81,1837 8166.81,2737 ; -1025.64,1837 9545.42,1837 9545.42,2737 -1025.64,2737 -1025.64,1837
  text "Symbol" at -935.64,2632 h72
  text "Count" at -429.77,2632 h72
  text "Hole Size" at 100.1,2632 h72
  text "Plated" at 1199.77,2632 h72
  text "Hole Type" at 1705.65,2632 h72
  text "Drill Layer Pair" at 2439.45,2632 h72
  text "Via/Pad" at 3939,2632 h72
  text "Pad Shape" at 4528.85,2632 h72
  text "Template" at 5274.65,2632 h72
  text "Description" at 6024.44,2632 h72
  text "Hole Tolerance (+)" at 6878.21,2632 h72
  text "Hole Tolerance (-)" at 8211.81,2632 h72
  text "2" at -429.77,2482 h60
  text "2.500mm (98.43mil)" at 100.1,2482 h60
  text "NPTH" at 1199.77,2482 h60
  text "Round" at 1705.65,2482 h60
  text "Top Layer - Bottom Layer" at 2439.45,2482 h60
  text "Pad" at 3939,2482 h60
  text "Rounded" at 4528.85,2482 h60
  text "c0hn250" at 5274.65,2482 h60
  text "6" at -429.77,2332 h60
  text "1.000mm (39.37mil)" at 100.1,2332 h60
  text "PTH" at 1199.77,2332 h60
  text "Round" at 1705.65,2332 h60
  text "Top Layer - Bottom Layer" at 2439.45,2332 h60
  text "Pad" at 3939,2332 h60
  text "Rounded" at 4528.85,2332 h60
  text "c180h100" at 5274.65,2332 h60
  text "10" at -429.77,2182 h60
  text "1.100mm (43.31mil)" at 100.1,2182 h60
  text "NPTH" at 1199.77,2182 h60
  text "Round" at 1705.65,2182 h60
  text "Top Layer - Bottom Layer" at 2439.45,2182 h60
  text "Pad" at 3939,2182 h60
  text "Rounded" at 4528.85,2182 h60
  text "c0hn110" at 5274.65,2182 h60
  text "63" at -429.77,2032 h60
  text "0.300mm (11.81mil)" at 100.1,2032 h60
  text "PTH" at 1199.77,2032 h60
  text "Round" at 1705.65,2032 h60
  text "Top Layer - Bottom Layer" at 2439.45,2032 h60
  text "Via" at 3939,2032 h60
  text "Rounded" at 4528.85,2032 h60
  text "v60h30m0mx0" at 5274.65,2032 h60
  text "81 Total" at -429.77,1882 h60

## Dimensions
2445.29,0 to 2445.29,1283.02 on Dimensions
0,1283.02 to 2442.77,1283.02 on Dimensions